# Altium PCB NB2DSK01.PcbDoc (part 16 of 17)
Units mil, origin at the board's own origin, x right, y up, seen from the top; angles counter-clockwise.
Board outline 11815 x 6500.03 mil, 8 copper layers (Top Layer, MidLayer1, MidLayer2, GND, PWR, MidLayer3, MidLayer4, Bottom Layer), stack 74.62 mil thick; 798 components, 1002 nets, 3927 pads, 3182 vias.
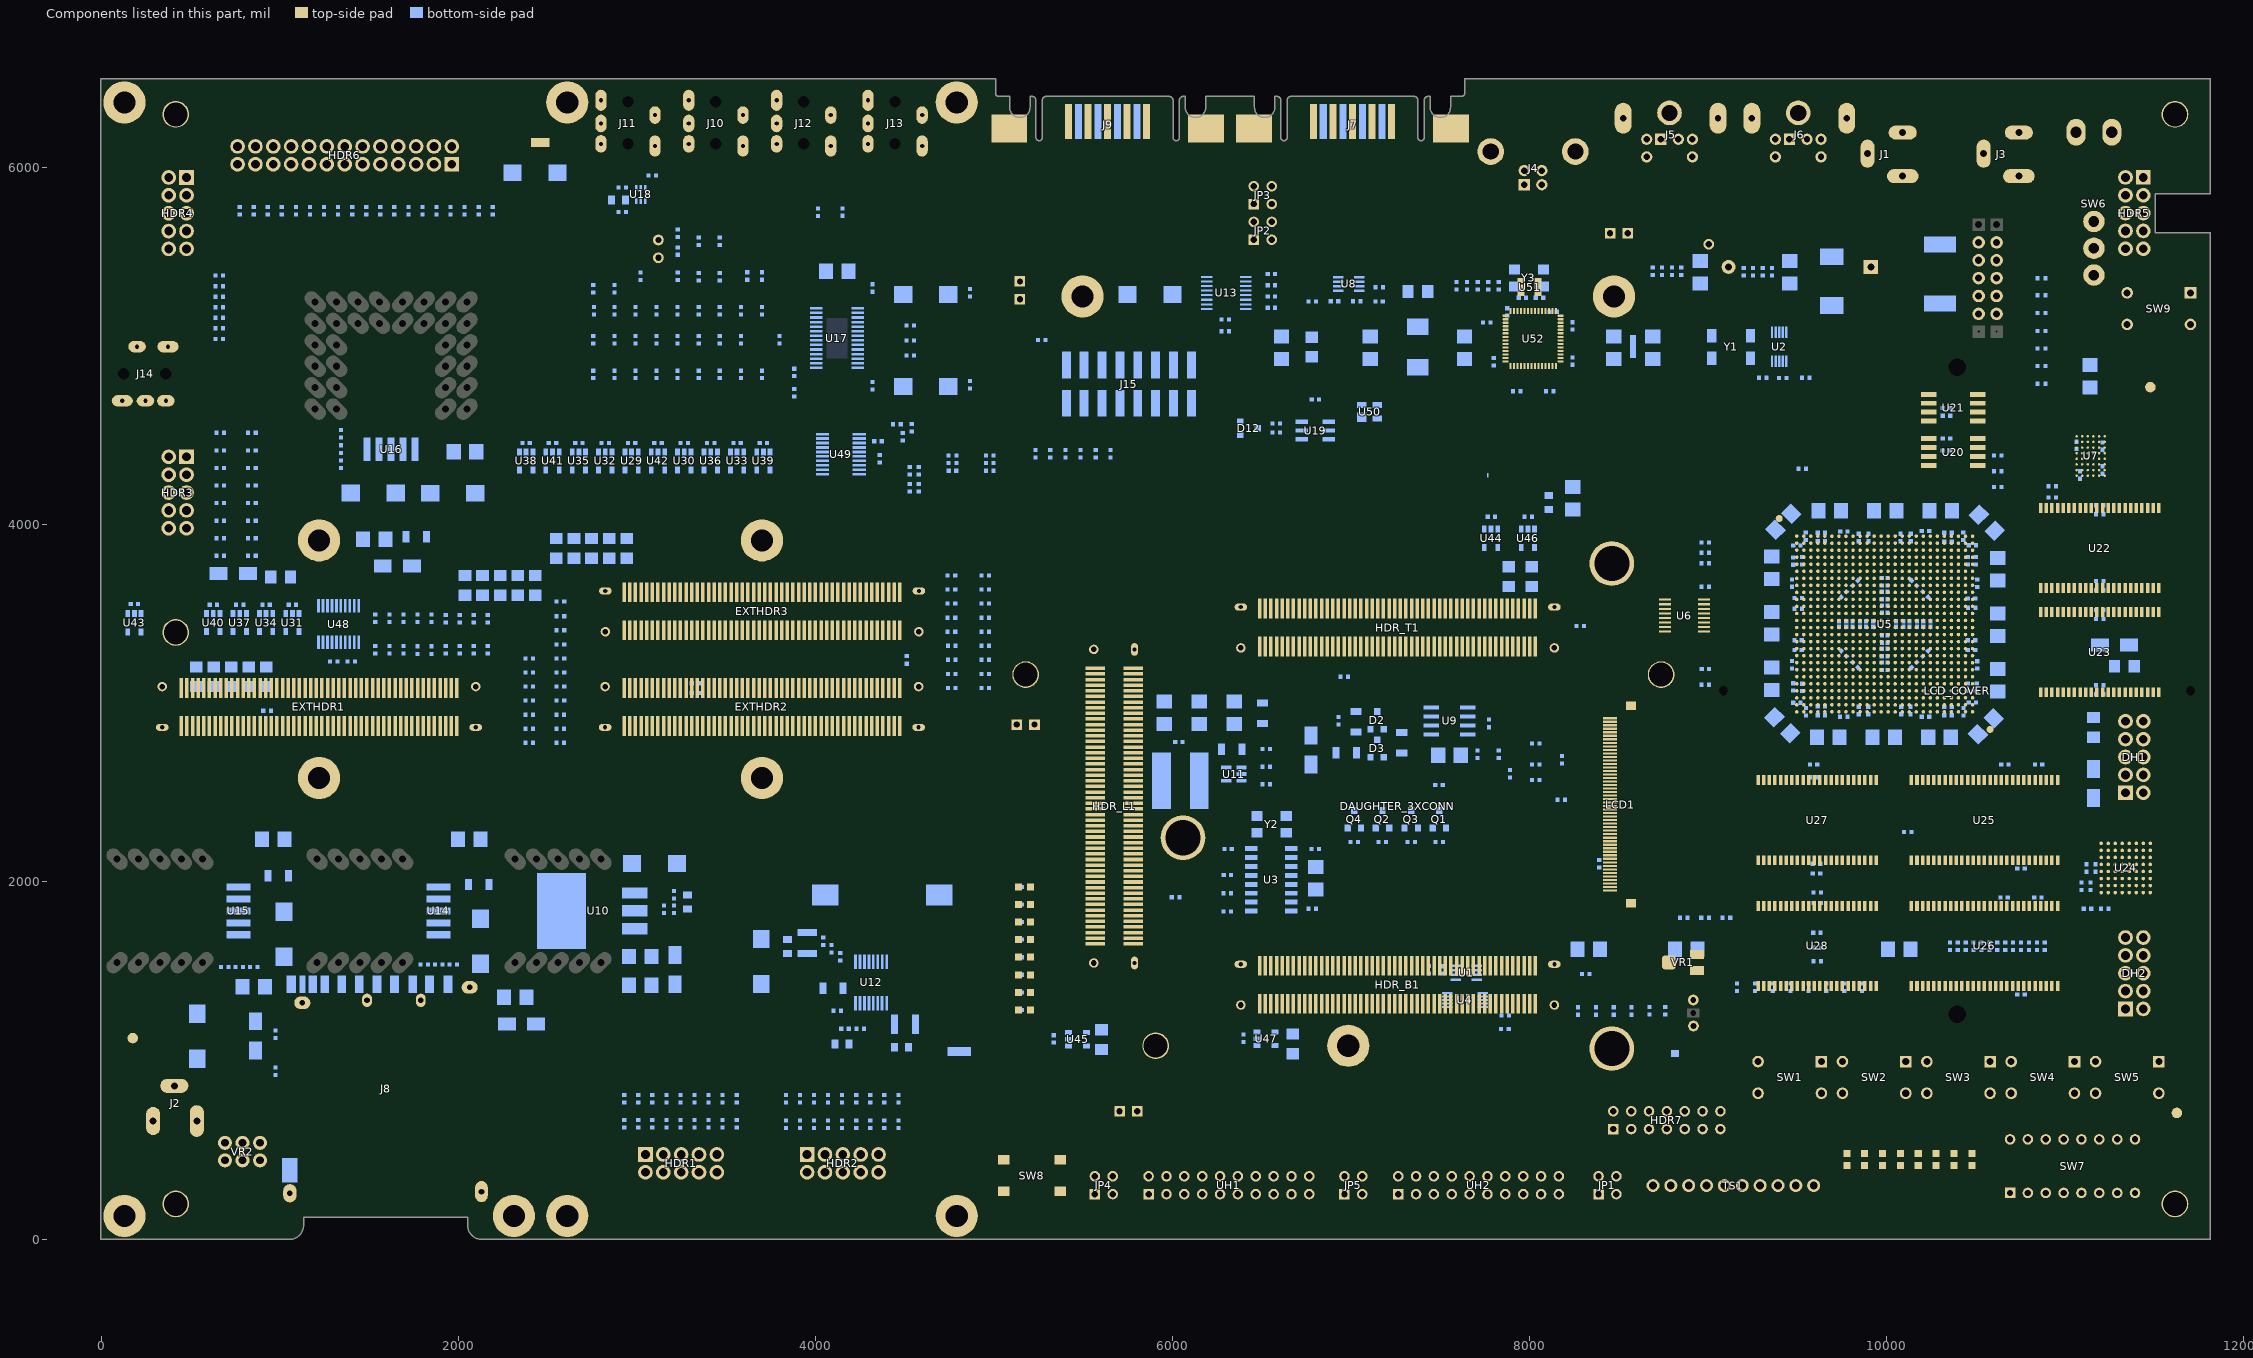
[diagram p22: the components of this part, seen from the top]

## Other copper (continued)
MidLayer3:
  region: 8912,4978.5 8912,4925.5 8926,4925.5 8926,4978.5
  rectangle net 1V2: 9204,3297 9401,3519
  rectangle net CSGND: 4303,4235 4344,4287.4
  rectangle net CSGND: 4284,4383 4346,4524
  rectangle net CSGND: 4344,4235 4519,4524
  rectangle net CSGND: 3997,4235 4303,4524
  rectangle net CSGND: 1196,3228 1468,3588
  rectangle net SHIELD: 10091,89 10495,228
  region net GND: 970.8,5426.84 970.8,4556 2281.17,4556 2281.17,5426.84
  rectangle net AUGND: 3966,4688.98 4276.87,4842.65
  rectangle net 1V2: 9295.68,3398.45 9533.68,3492.45
  rectangle net VCCX: 2228,1458 2873.68,2208
  rectangle net GND: 17,1458 643.68,2208
  rectangle net GND: 1118,1458 1763.68,2208
  text "L3" at 8850.5,4934.5 h35
Bottom Layer:
  rectangle net CAN_V+: 6801.84,6233 6886.4,6379
  rectangle: 6911.09,6233 6995.65,6379
  rectangle net CAN#.CAN_H: 7020.34,6233 7104.9,6379
  rectangle net GND: 7129.59,6233 7214.15,6379
  rectangle net RS232#.DCD: 5758.38,6233 5842.94,6379
  rectangle net RS232#.RTS: 5649.13,6233 5733.69,6379
  rectangle net RS232#.CTS: 5539.88,6233 5624.44,6379
  rectangle net RS232#.RI: 5430.63,6233 5515.18,6379
  region net SHIELD: 7647.54,6299.98 7470.54,6299.98 7470.54,6142.98 7647.54,6142.98
  rectangle net SHIELD: 6368.21,6142.98 6545.21,6299.98
  region net SHIELD: 6276.33,6299 6099.33,6299 6099.33,6142 6276.33,6142
  rectangle net SHIELD: 4997,6142 5174,6299
  region net GND: 9326,3967.41 9382.05,4023.46 9349.7,4055.81 9293.65,3999.76
  region net 2V5: 10510.79,4107 10566.84,4050.95 10599.19,4083.3 10543.14,4139.35
  region net GND: 10640.22,3957.08 10597.22,3914.08 10620.75,3890.55 10663.75,3933.55
  region net GND: 10536.02,2746.42 10592.07,2802.47 10561.27,2833.27 10505.22,2777.22
  region net GND: 9465.59,2782.79 9409.54,2838.84 9377.19,2806.49 9433.24,2750.44
  region net 2V5: 9459.76,2957.52 9406.26,3011.01 9353.26,2958.01 9406.75,2904.52
  region net 2V5: 10559.28,3010.75 10505.79,2957.26 10558.79,2904.26 10612.28,2957.75
  region net 2V5: 10523.66,4008.16 10470.16,4061.65 10417.16,4008.64 10470.65,3955.15
  region: 8912,4872.5 8912,4819.5 8926,4819.5 8926,4872.5
  region net 2V5: 9519.55,3937.65 9580.45,3998.55 9519.2,4059.8 9458.3,3998.9
  rectangle net 1V2: 3770,1696.4 3930,1990
  region net VCCX: 7955,2079 7955,2148 7895,2148 7895,2079
  region net VCCX: 7954,2009 7954,2038 7894,2038 7894,2009
  region net DBPOWER.3V3: 7981,1646 7925,1646 7925,1594 7981,1594
  region net VCCX: 7983,1260 7922,1260 7922,1203 7983,1203
  region net DBPOWER.5V0: 8086.8,1369 8048.19,1369 8048.19,1257 8086.8,1257
  rectangle net VCCX: 2248.68,1488.45 2867.85,2188.45
  rectangle net GND: 23.68,1477 642.85,2207.2
  rectangle net 3V3: 9965.68,3422.45 10010.68,3466.45
  rectangle net GND: 4593.68,1038.45 4673.68,1253.45
  rectangle net GND: 3668.68,1283.45 3768.68,1368.45
  rectangle net GND: 3838.68,1488.45 4008.68,1568.45
  rectangle net 5V0: 4303.68,1103.45 4393.68,1258.45
  region net GND: 10569.27,228 10538.64,228 10538.64,89 10569.27,89
  rectangle net GND: 10016.73,89 10047.67,228
  rectangle net SHIELD: 942.68,225 1001,648
  region net SHIELD: 986.68,185.45 986.68,233.45 818.68,233.45 818.68,185.45
  region net SHIELD: 640,648 588,648 588,225 640,225
  rectangle net SHIELD: 588,593 1001,648
  rectangle net SHIELD: 588,225 1001,391.73
  rectangle net SHIELD: 10091,89 10495,228
  rectangle net GND: 8047.06,1459.38 8085.67,1604.37
  region net 9V0: 7617,2952 7484,2952 7484,2849 7617,2849
  rectangle net AUGND: 4054.13,5203.74 4183.07,5231.3
  rectangle net AUGND: 3960.63,4759.84 4279.53,4862.21
  rectangle net AUGND: 4054.13,4861.22 4183.07,4888.78
  rectangle net AUGND: 4054.13,5178.15 4183.07,5205.71
  rectangle net AUGND: 4054.13,5152.56 4183.07,5180.12
  rectangle net AUGND: 4054.13,5126.97 4183.07,5154.53
  rectangle net AUGND: 3960.63,5230.32 4279.53,5330.71
  rectangle net AUGND: 4287.4,4964.57 4358.27,5015.75
  rectangle net AUGND: 3854.33,5000 3943.9,5066.93
  rectangle net GND: 1143.68,1481.88 1762.85,2204.6
  region net GND: 970.8,5428.45 970.8,4549 2236.22,4549 2236.22,5428.45
  rectangle net PBPOWER.1V2PBB: 3310,3149 3336,3186
  region net PBPOWER.1V8PBB: 3272.68,3197.46 3246.68,3197.46 3246.68,3160.46 3272.68,3160.46
  rectangle net PBPOWER.2V5PBB: 3184.02,3149 3210.02,3186
  region net PBPOWER.3V3PBB: 3146.69,3197.46 3120.69,3197.46 3120.69,3160.46 3146.69,3160.46
  rectangle net NetF1_1: 10220,5569.63 10378,5940
  region net 5VUSW: 10237.55,5509 10237.55,5238.92 10360.55,5238.92 10360.55,5509
  region net 5VUSW: 9643,5514.68 9643,5303 9744,5303 9744,5514.68
  region net GND: 9643,5241.06 9643,5099 9744,5099 9744,5241.06
  rectangle net 2V5: 895,1542 1047,1634
  rectangle net NetL2_1: 4318,1376 4599,1502
  rectangle net 1V2: 3770,1866 4132,1990
  region net SHIELD: 10494.85,205.58 10513.68,201.45 10494.85,197.58 10494.85,205.58
  region net 3V3: 10413.39,3334.65 10437.01,3350.39 10448.82,3350.39 10448.82,3303.15 10437.01,3303.15 10413.39,3318.9
  region net 3V3: 10413.39,3570.87 10437.01,3586.62 10448.82,3586.62 10448.82,3539.37 10437.01,3539.37 10413.39,3555.12
  region net 3V3: 10098.43,3870.08 10082.68,3893.7 10082.68,3905.51 10129.92,3905.51 10129.92,3893.7 10114.17,3870.08
  region net 3V3: 9862.2,3870.08 9846.46,3893.7 9846.46,3905.51 9893.7,3905.51 9893.7,3893.7 9877.95,3870.08
  region net 3V3: 9562.99,3555.12 9539.37,3539.37 9527.56,3539.37 9527.56,3586.61 9539.37,3586.61 9562.99,3570.87
  region net 3V3: 9562.99,3318.9 9539.37,3303.15 9527.56,3303.15 9527.56,3350.39 9539.37,3350.39 9562.99,3334.64
  region net 3V3: 9877.95,3019.69 9893.7,2996.06 9893.7,2984.25 9846.46,2984.25 9846.46,2996.06 9862.2,3019.69
  region net 3V3: 10114.18,3019.69 10129.92,2996.06 10129.92,2984.25 10082.68,2984.25 10082.68,2996.06 10098.43,3019.69
  region net GND: 10538.85,205.58 10519.32,201.58 10538.85,197.58 10538.85,205.58
  region net GND: 10538.8,195.58 10519.26,191.58 10538.8,187.58 10538.8,195.58
  region net SHIELD: 10494.8,195.58 10513.68,191.45 10494.8,187.58 10494.8,195.58
  region net GND: 10538.8,185.58 10519.26,181.58 10538.8,177.58 10538.8,185.58
  region net SHIELD: 10494.8,185.58 10513.68,181.45 10494.8,177.58 10494.8,185.58
  region net GND: 10538.8,175.58 10519.68,171.45 10538.8,167.58 10538.8,175.58
  region net SHIELD: 10494.8,175.58 10514.33,171.58 10494.8,167.58 10494.8,175.58
  region net GND: 10538.8,165.58 10519.26,161.58 10538.8,157.58 10538.8,165.58
  region net SHIELD: 10494.8,165.58 10513.68,161.45 10494.8,157.58 10494.8,165.58
  region net GND: 10538.8,155.58 10519.26,151.58 10538.8,147.58 10538.8,155.58
  region net SHIELD: 10494.8,155.58 10513.68,151.45 10494.8,147.58 10494.8,155.58
  region net GND: 10538.8,145.58 10519.68,141.45 10538.8,137.58 10538.8,145.58
  region net SHIELD: 10494.8,145.58 10514.33,141.58 10494.8,137.58 10494.8,145.58
  region net GND: 10538.8,135.58 10519.68,131.45 10538.8,127.58 10538.8,135.58
  region net SHIELD: 10494.8,135.58 10514.33,131.58 10494.8,127.58 10494.8,135.58
  region net GND: 10538.8,125.58 10519.68,121.45 10538.8,117.58 10538.8,125.58
  region net SHIELD: 10494.8,125.58 10514.33,121.58 10494.8,117.58 10494.8,125.58
  region net GND: 10538.8,115.58 10519.68,111.45 10538.8,107.58 10538.8,115.58
  region net SHIELD: 10494.8,115.58 10514.33,111.58 10494.8,107.58 10494.8,115.58
  region net GND: 10047.28,115.58 10066.81,111.58 10047.28,107.58 10047.28,115.58
  region net SHIELD: 10091.28,115.58 10072.68,111.45 10091.28,107.58 10091.28,115.58
  region net GND: 10047.28,125.58 10066.81,121.58 10047.28,117.58 10047.28,125.58
  region net SHIELD: 10091.28,125.58 10072.68,121.45 10091.28,117.58 10091.28,125.58
  region net GND: 10047.28,135.58 10066.81,131.58 10047.28,127.58 10047.28,135.58
  region net SHIELD: 10091.28,135.58 10072.68,131.45 10091.28,127.58 10091.28,135.58
  region net GND: 10047.28,145.58 10066.81,141.58 10047.28,137.58 10047.28,145.58
  region net SHIELD: 10091.28,145.58 10072.68,141.45 10091.28,137.58 10091.28,145.58
  region net GND: 10047.28,155.58 10066.81,151.58 10047.28,147.58 10047.28,155.58
  region net SHIELD: 10091.28,155.58 10072.68,151.45 10091.28,147.58 10091.28,155.58
  region net GND: 10047.15,165.45 10066.68,161.45 10047.15,157.45 10047.15,165.45
  region net SHIELD: 10091.28,165.58 10071.74,161.58 10091.28,157.58 10091.28,165.58
  region net GND: 10047.28,175.58 10066.81,171.58 10047.28,167.58 10047.28,175.58
  region net SHIELD: 10091.28,175.58 10072.68,171.45 10091.28,167.58 10091.28,175.58
  region net GND: 10047.28,185.58 10066.81,181.58 10047.28,177.58 10047.28,185.58
  region net SHIELD: 10091.28,185.58 10072.68,181.45 10091.28,177.58 10091.28,185.58
  region net GND: 10047.28,195.58 10066.81,191.58 10047.28,187.58 10047.28,195.58
  region net SHIELD: 10091.28,195.58 10072.68,191.45 10091.28,187.58 10091.28,195.58
  region net SHIELD: 10091.33,205.58 10072.68,201.45 10091.33,197.58 10091.33,205.58
  region net GND: 10047.33,205.58 10066.87,201.58 10047.33,197.58 10047.33,205.58
  text "BL" at 8850.5,4828.5 h35
GND (plane layer: these items are gaps in the copper):
  circle w60: c5096.6,798.52 r38.29
  region: 8928.5,4817 8928.5,5031.5 8796.5,5031.5 8796.5,4817
  region: 8796.5,5246 8796.5,5084.5 8928.5,5084.5 8928.5,5246
  lines w5: 8811,5057.37 8839.91,5057.37 ; 8811,5057.37 8810.92,5046.77 8839.91,5057.37 ; 8811,5057.37 8810.92,5067.98 8839.91,5057.37
  lines w7: 8814.45,5053.13 8824.35,5053.13 ; 8814.45,5061.62 8824.35,5061.62
  text "P1" at 8850.5,5040.5 h35
  text "GND" at 358.27,425.2 h34
PWR (plane layer: these items are gaps in the copper):
  circle w60: c5096.6,798.52 r38.29
  region: 8796.5,5246 8796.5,5031.5 8928.5,5031.5 8928.5,5246
  region: 8928.5,4817 8928.5,4978.5 8796.5,4978.5 8796.5,4817
  lines w5: 8811,5004.37 8810.92,5014.98 8839.91,5004.37 ; 8811,5004.37 8810.92,4993.77 8839.91,5004.37 ; 8811,5004.37 8839.91,5004.37
  lines w7: 8814.45,5000.13 8824.35,5000.13 ; 8814.45,5008.62 8824.35,5008.62
  lines w38: 10984.46,5474 11280.74,5474
  lines w40: 788,582 925.2,582 4720,582 5047,255 5121,181 9968,181 10042,255 10148,361 10401,361 11040,361 11415,736 11415,1099 11527,1211 11527,4506 11380.53,4652.47 11380.53,5077.94 11280.74,5177.72 11280.74,5331.26 11280.74,5778.26 ; 789,0 789,937.33 789,1143.33 ; 1299.84,3833.31 1394.99,3928.45 1673.68,3928.45 1723.68,3978.45 1723.68,4138.45 1758.68,4173.45 1888.68,4173.45 2510.85,4173.45 2615.9,4068.4 2615.9,3766.4 2528.7,3679.2 2134.9,3679.2 2087.6,3726.5 2087.6,3851.4 2061.6,3877.4 2014.5,3877.4 1983.8,3846.7 1983.8,3685.1 1969.15,3670.45 1815.68,3670.45 1503.68,3670.45 1187.45,3354.23 610.13,3354.23 586.61,3330.71 586.61,1833.45 2505.74,1833.45 3681.34,1833.45 4603.68,1833.45 ; 1303.15,3836.61 1230.32,3763.78 701.71,3763.78 653.54,3811.95 653.54,3876.17 653.54,5673.23 763.78,5783.47 2456.69,5783.47 2503.94,5736.22 2503.94,4685.04 2637.8,4551.18 4663.86,4551.18 5216.6,5103.92 5560.61,5103.92 6000.92,5103.92 6112,5215 6112,5343 6298,5529 8696.54,5529 10929.46,5529 10973.46,5485 10984.46,5474 ; 4605.32,1835.09 4603.68,1833.45 ; 4755.91,3.94 4759.84,0 ; 4912,6496.06 4912,6043 4964,5991 8398,5991 8423.45,6016.45 8622,6215 8961,6215 9015,6161 9286,6161 9338,6213 9680,6213 9720,6173 9737,6156 9822,6156 9881,6215 10844,6215 11280.74,5778.26 ; 9587,5528 9587,5292 11280.74,5292 ; 11280.74,5606 11280.74,5778.26 ; 789,1143.33 925.2,1279.53 ; 789,1143.33 925.2,1279.53 ; 925.2,1279.53 2947.61,1279.53 3134.97,1092.17 4099.18,1092.17 4235.64,955.71 4528.54,955.71 4893.51,955.71 5934.3,1996.5 6165.4,1996.5 6283.3,2114.4 6306.9,2138 6306.9,2714.6 6306.9,2763 6268,2801.9 6219.6,2801.9 5948.4,2801.9 5884.7,2738.2 4979.95,1833.45 4603.68,1833.45
  text "P2" at 8850.5,4987.5 h35
  text "3V3" at 853.68,648.45 h78.74
  text "5V0" at 318.25,475.42 h78.74
  text "SHIELD" at 1018.68,433.45 h78.74
Multi-Layer:
  text "1" at 19394.94,-5240.28 h120
  text "OF" at 19590.02,-5239.73 h80
  text "1" at 19829.94,-5240.28 h120

## Silkscreen, mask and mechanical layers (free items; w line width, h text height)
Top Overlay:
  drawing of 8418 lines, arcs and shapes, not listed
  text "KMDGX-6S-BS2715C" at 8539,6412 h34
  text "KMDGX-6S-BS3395C" at 9259.47,6412 h34
  text "5VDC" at 10324.54,6411.05 h80
  text "POWER" at 10285.17,6337.59 h80
  text "PC PARALLEL PORT" at 911,6272 h102.36
  text "IN" at 10387.53,6264.31 h80
  text "DC" at 10285,6113 h70
  text "L" at 2862,6073 h34
  text "R" at 3020,6073 h34
  text "L" at 3354.13,6073 h34
  text "R" at 3512.13,6073 h34
  text "L" at 3846.25,6073 h34
  text "R" at 4004.25,6073 h34
  text "L" at 4358.06,6073 h34
  text "R" at 4516.06,6073 h34
  text "NANOTALK" at 57,6030 h90
  text "NANOTALK" at 11332.23,6030.39 h90
  text "MICROPHONE" at 2773.76,5994.71 h60
  text "LINE OUT" at 3809.19,5995.5 h60
  text "LINE IN" at 3347.03,5993.92 h60
  text "HEADPHONES" at 4261.5,5992.35 h60
  text "MOUSE" at 9389,5907 h80
  text "KEYBOARD" at 8568,5903 h80
  text "1+2  CiA DS102" at 6678,5869.37 h60
  text "PIN 2 - RXD" at 5179.8,5861.6 h60
  text "TOP SIDE" at 1238.22,5842.53 h100
  text "PIN 3 - TXD" at 5179.8,5803.36 h60
  text "2+4 and 1+3  NB1" at 6677.94,5796.32 h60
  text "INSERT" at 76.24,5785.88 h40
  text "RS232" at 5626.7,5776 h120
  text "CAN" at 7291.58,5775.5 h120
  text "PIN 7 - RTS" at 5179.8,5744.56 h60
  text "KEY" at 115.18,5722.49 h40
  text "PIN 8 - CTS" at 5179.8,5685.68 h60
  text "2" at 6348.68,5678.45 h39.37
  text "4" at 6618.68,5678.45 h39.37
  text "1+2 CAN 1Mbps Mode" at 6678,5672.54 h55
  text "0V" at 10388,5670 h45
  text "0V" at 10694,5668 h45
  text "GND" at 10791,5660 h70.87
  text "DOWN" at 89.85,5659.1 h40
  text "GND" at 10205,5659 h70.87
  text "USB 2.0" at 7854.33,5649.61 h102.36
  text "DS102" at 7256.7,5646 h110
  text "EIA-574" at 5611.7,5645.4 h110
  text "PINS 1+4+6" at 5179.8,5626.8 h60
  text "3+4 CAN 120R  TERM" at 6678,5593.55 h55
  text "-7V5" at 10210,5559 h70.87
  text "FROM" at 32,5553 h70
  text "TO" at 11529.26,5553.39 h70
  text "GND" at 8425.68,5516.45 h78.74
  text "MASTER" at 30,5489 h70
  text "SLAVE" at 11527.26,5489.39 h70
  text "16V5" at 10198,5459 h70.87
  text "+" at 9001.81,5444.99 h40
  text "LM4849MH" at 3957.34,5381.65 h70
  text "9V0" at 10230,5359 h70.87
  text "CR2032" at 8775.5,5329.64 h80
  text "GND" at 4900,5270 h78.74
  text "3V0" at 9083.8,5234.8 h60
  text "DAUGHTER BOARD" at 6443,5199 h102.36
  text "VBAT" at 10791,5159 h70.87
  text "AUDIO TEST" at 37.82,5079.05 h86.61
  text "POWER SUPPLY TEST POINTS" at 10314,5045 h50
  text "TP0" at 10152,5038 h80
  text "R" at 423.06,4916.3 h34 r90
  text "GROUND" at 1442.68,4888.45 h94.49
  text "L" at 423.06,4758.3 h34 r90
  text "25P80" at 10358,4735 h36 r270
  text "AUDIO AMPLIFIER" at 3922.66,4672.45 h50
  text "XCF08PFS48C" at 10989,4615 h35
  text "SYSTEM 3V3 SUPPLY" at 1384,4518 h52
  text "25P80" at 10358,4486.97 h36 r270
  text "SYSTEM JTAG" at 15.76,4451.81 h80
  text "NB2DSK01.08" at 5883.26,4442.23 h98.43
  text "Desktop" at 5883.26,4384.24 h60
  text "NanoBoard" at 5883.27,4308.27 h60
  text "NB2DSK01.08" at 6536.61,4272.23 h60
  text "FLASH" at 11061.02,4149.33 h34
  text "PERIPHERAL BOARD C" at 3185,4106 h102.36
  text "XC3S1500-4FG676C" at 9512.3,4019.48 h50
  text "SRAM-256Kx16" at 10932.32,3907.25 h50
  text "AD7843" at 8863,3561 h30 r270
  text "SRAM-256Kx16" at 10932.32,3324.57 h50
  text "SRAM" at 11085.19,2950.27 h60
  text "USER POWER CONFIG" at 7117.98,2823 h34
  text "JP4/JP5" at 6880.65,2819 h60
  text "GND" at 5096,2760 h78.74
  text "SDRAM" at 10413.03,2680.78 h60
  text "SRAM" at 9501.7,2679.2 h60
  text "5V0" at 7086.18,2651.75 h75
  text "3V3" at 7460.63,2651.69 h75
  text "- POWER CONFIG USER I/O PORT A" at 6905.44,2490.39 h32
  text "DEBUG PORT A" at 11561,2489 h40 r90
  text "JP4" at 6782.44,2486.69 h60
  text "- POWER CONFIG USER I/O PORT B" at 6905.44,2427.39 h32
  text "JP5" at 6782.44,2423.69 h60
  text "PERIPHERAL BOARD A" at 708,2325 h102.36
  text "PERIPHERAL BOARD B" at 3188.32,2324 h102.36
  text "SRAM-256Kx16" at 9333.07,2251.71 h50
  text "DRAM-16Mx16" at 10299.55,2250.13 h50
  text "DAC REFERENCE CONFIG" at 7015.3,2168.15 h34
  text "JP1" at 6880.33,2164.15 h60
  text "HOST STATUS" at 4912,2053 h60
  text "2.048" at 7085.92,1996.84 h75
  text "3.30" at 7460.31,1996.9 h75
  text "SL1" at 4969.82,1949.12 h70.87
  text "SL2" at 4969.82,1851.45 h70.87
  text "GROUND" at 1293.68,1828.45 h94.49
  text "GROUND" at 148.68,1818.45 h94.49
  text "VCCX" at 2443.68,1818.45 h94.49
  text "S29GL256N11FFIV" at 11128.8,1763 h35
  text "SL3" at 4969.82,1753.45 h70.87
  text "FLASH" at 11131.2,1705.2 h34
  text "CONTRAST" at 8739,1700 h34
  text "SL4" at 4969.82,1654.45 h70.87
  text "SL5" at 4969.82,1555.45 h70.87
  text "SRAM-256Kx16" at 9333.07,1546.99 h50
  text "DRAM-16Mx16" at 10299.55,1545.41 h50
  text "SL6" at 4969.82,1457.45 h70.87
  text "DAUGHTER BD ADJ SUPPLY" at 2246,1424 h52
  text "SYSTEM 2V5 SUPPLY" at 73,1422 h52
  text "SYSTEM 1V8 SUPPLY" at 1218,1422 h52
  text "SL7" at 4969.82,1358.45 h70.87
  text "DEBUG PORT B" at 11561,1277.98 h40 r90
  text "SL8" at 4969.82,1260.45 h70.87
  text "K" at 5226.74,1093.3 h30
  text "TOUCH" at 8684.02,972.01 h100
  text "5VDC OUT" at 165.35,964.57 h80
  text "SCREEN" at 8685.98,890 h100
  text "V8" at 8050,674 h140
  text "DC" at 726.89,656.96 h80
  text "GND" at 5675,596 h78.74
  text "USER LEDS" at 9988,569 h55
  text "K" at 10549,556 h30
  text "USER BOARD POWER" at 110.24,460.63 h50
  text "I2C - DAC - ADC" at 8704.73,448.82 h102.36
  text "CONFIG SWITCH 7" at 10734.16,384.61 h50
  text "2" at 5473.68,333.45 h39.37
  text "4" at 5728.68,333.45 h39.37
  text "2" at 6873.68,333.45 h39.37
  text "4" at 7128.68,333.45 h39.37
  text "2" at 8293.68,333.45 h39.37
  text "4" at 8548.68,333.45 h39.37
  text "7" at 9757.78,284.37 h94.49
  text "6" at 9857.78,284.37 h94.49
  text "5" at 9957.78,284.37 h94.49
  text "4" at 10057.78,284.37 h94.49
  text "3" at 10156.2,284.37 h94.49
  text "2" at 10254.63,284.37 h94.49
  text "1" at 10357.78,284.37 h94.49
  text "0" at 10457.78,284.37 h94.49
  text "3" at 7128.68,233.45 h39.37
  text "1" at 8303.68,233.45 h39.37
  text "3" at 8548.68,233.45 h39.37
  text "1" at 5483.68,228.45 h39.37
  text "3" at 5728.68,228.45 h39.37
  text "1" at 6883.68,228.45 h39.37
  text "ESD" at 9952,186 h60
  text "SD/Multimedia Card" at 1191.68,166.45 h94.49
  text "User Board A" at 2982.68,164.45 h94.49
  text "User Board B" at 3882.68,164.45 h94.49
  text "DAUGHTER BD" at 4998.28,129.63 h65
  text "+" at 8673.11,118.59 h40
  text "-" at 9573.11,118.59 h40
  text "1" at 9280,117 h66.93
  text "0" at 9177,116 h66.93
  text "2" at 9376,116 h66.93
  text "0" at 8776,115 h66.93
  text "1" at 8882,115 h66.93
  text "2" at 8977,115 h66.93
  text "3" at 9080,115 h66.93
  text "3R" at 9462,115 h66.93
  text "5V" at 5588.68,63.45 h70.87 r90
  text "5V" at 6988.68,63.45 h70.87 r90
  text "3V3" at 7088.68,48.45 h70.87 r90
  text "3V3" at 8508.68,48.45 h70.87 r90
  text "REF" at 8408.68,43.45 h70.87 r90
  text "3V3" at 5688.68,38.45 h70.87 r90
  text "Analogue In" at 9306,36 h65
  text "Analogue Out" at 8741,35 h65
  text "TEST/RESET" at 4993.16,32.7 h80
  text "Volume" at 743.68,28.45 h94.49
  text "User Header A" at 6225,24 h94.49
  text "User Header B" at 7626,24 h94.49
  text "TOUCH HERE FIRST" at 9751,20 h34
Bottom Overlay:
  drawing of 3399 lines, arcs and shapes, not listed
  text "1" at 2862.06,6417.43 h35
  text "PURPLE" at 8963.68,6398.45 h100
  text "GREEN" at 9663.68,6398.45 h100
  text "ON/OFF" at 11323.68,6398.45 h100
  text "DC OUT" at 10258.68,6393.45 h100
  text "DC IN" at 10848.68,6393.45 h100
  text "1" at 3354.18,6358.73 h35
  text "1" at 3846.31,6358.73 h35
  text "1" at 4358.12,6358.73 h35
  text "10" at 3056.33,6279.5 h35
  text "10" at 3548.46,6279.5 h35
  text "10" at 4040.59,6279.5 h35
  text "10" at 4552.4,6279.5 h35
  text "11" at 2884.08,6222.85 h35
  text "11" at 3376.2,6222.85 h35
  text "11" at 3868.33,6222.85 h35
  text "11" at 4380.14,6222.85 h35
  text "2" at 8909.88,6203.09 h40
  text "2" at 9630.35,6203.09 h40
  text "2" at 9960.44,6180.1 h40
  text "2" at 10610.84,6180.1 h40
  text "9" at 6791.26,6162.63 h34
  text "6" at 7236.36,6160.71 h34
  text "USB PORT" at 8130,6151.04 h35
  text "4" at 9016.28,6142.7 h40
  text "4" at 9736.75,6142.7 h40
  text "3" at 8571.8,6140.98 h40
  text "3" at 9292.28,6140.98 h40
  text "+" at 6826.31,6125.76 h40 r270
  text "3" at 2873.21,6115.15 h35
  text "3" at 3365.33,6115.15 h35
  text "3" at 3857.46,6115.15 h35
  text "3" at 4369.27,6115.15 h35
  text "2" at 3050.46,6109.29 h35
  text "2" at 3542.59,6109.29 h35
  text "2" at 4034.72,6109.29 h35
  text "2" at 4546.53,6109.29 h35
  text "4" at 7981.56,6061.99 h40
  text "3" at 8079.55,6061.99 h40
  text "3" at 9999.73,6061.99 h40
  text "3" at 10650.13,6061.99 h40
  text "6" at 9016.28,6044.27 h40
  text "6" at 9736.75,6044.27 h40
  text "5" at 8571.8,6042.56 h40
  text "5" at 9292.28,6042.56 h40
  text "RS232 SERIAL PORT" at 5863.3,6016.6 h35
  text "CAN PORT" at 7130.2,6015.9 h35
  text "+" at 10207.73,5970 h40 r180
  text "+" at 10858.12,5970 h40 r180
  text "PINK" at 2893,5940 h60
  text "BLACK" at 3447,5940 h60
  text "GREEN" at 3940,5940 h60
  text "BLUE" at 4404.4,5940.31 h60
  text "PS2 KEYBOARD INTERFACE" at 9100,5940.47 h35
  text "NANOTALK" at 11222,5938 h35
  text "1" at 9960.45,5936.01 h40
  text "1" at 10610.84,5936.01 h40
  text "PS2 MOUSE INTERFACE" at 9785,5935.47 h35
  text "OUT" at 11223,5883 h35
  text "MIC IN" at 3221,5878 h35
  text "LINE IN" at 3625,5878 h35
  text "LINE OUT" at 4119,5878 h35
  text "HEADPHONES" at 4605,5878 h35
  text "BOTTOM SIDE" at 1600,5843 h100
  text "9812" at 3059,5840 h24
  text "1" at 7977.76,5789.04 h40
  text "2" at 8086.75,5789.04 h40
  text "1" at 11276.84,5682.38 h40
  text "+" at 9098.91,5579.96 h40 r270
  text "24MHz" at 8067,5482 h34
  text "3051" at 6993.01,5383.72 h23 r90
  text "3" at 11288.58,5382.38 h40
  text "SYSTEM 3V3 SUPPLY" at 1873,5354 h52.01
  text "3232" at 6310.89,5345.6 h34 r90
  text "FUSE" at 10276,5331 h80 r270
  text "NANOTALK IN" at 525,5279 h35
  text "32K768Hz" at 9240.3,5127.3 h34
  text "AUDIO TEST IN" at 437,5070 h35
  text "3V3" at 5418.57,5009.51 h60
  text "1W" at 5517,5009.19 h60
  text "CS2" at 5644.17,5009.28 h60
  text "CK2" at 5769.85,5009.41 h60
  text "L+" at 5850.33,5009.41 h60
  text "5V" at 5947.7,5009.58 h60
  text "R-" at 6027.37,5009.26 h60
  text "AGND" at 6209,5009.24 h60
  text "1391" at 9447.6,4976.11 h34
  text "2" at 388.69,4919.56 h35
  text "10" at 223.76,4916.63 h35
  text "BLACK" at 696.85,4755.91 h60
  text "1" at 128.09,4743.48 h35
  text "11" at 268.96,4742.3 h35
  text "3" at 374.02,4741.72 h35
  text "DS2406" at 6799.39,4599.65 h28 r90
  text "L-" at 5824.66,4533.69 h60
  text "CK1" at 5418.76,4533.52 h60
  text "DI1" at 5517,4533.46 h60
  text "CS1" at 5635.3,4533.56 h60
  text "DI2" at 5739.78,4533.46 h60
  text "GND" at 5963.66,4533.52 h60
  text "R+" at 6054.66,4533.54 h60
  text "VOL" at 6183.66,4533.52 h60
  text "TO NB2DSK-SPK01" at 6264.1,4382.09 h35
  text "4372" at 2433.42,4345.45 h32
  text "4372" at 2581.06,4345.45 h32
  text "4372" at 2728.69,4345.45 h32
  text "4372" at 2876.33,4345.45 h32
  text "4372" at 3023.97,4345.45 h32
  text "4372" at 3171.61,4345.45 h32
  text "4372" at 3319.24,4345.45 h32
  text "4372" at 3466.88,4345.45 h32
  text "4372" at 3614.52,4345.45 h32
  text "4372" at 3762.16,4345.45 h32
  text "MAX1229" at 4135,4301 h34 r270
  text ".Application_BuildNumber" at 6530.13,4050 h95
  text "BUILD No:" at 6907.79,4050 h50
  text "SVN 6145" at 6530.13,3941.67 h95
  text "REVISION No:" at 7017.76,3941.67 h50
  text "4372" at 7836.96,3912.38 h32
  text "4372" at 8043.65,3912.38 h32
  text "+5V" at 386,3846 h50 r270
  text "MACHINE ID:" at 6988.96,3833.33 h50
  text "GND" at 460,3830 h50 r270
  text ".ComputerName" at 6530.13,3829.39 h95
  text "PCB MANUFACTURER:" at 7324.13,3725 h50
  text "HOST PROGRAMMING" at 557.6,3700.5 h35
  text "PORT" at 557.6,3645.6 h35
  text "4372" at 681.45,3439.94 h32
  text "4372" at 829.09,3439.94 h32
  text "4372" at 976.72,3439.94 h32
  text "4372" at 1124.36,3439.94 h32
  text "4372" at 239.5,3438.9 h32
  text "MAX1229" at 1438,3422 h34
  text "NB2DSK01" at 4077.14,3325.35 h150
  text "GND" at 11355,3053 h50 r90
  text "+5V" at 11429,3037 h50 r90
  text "LM317" at 7526,2825 h34 r270
  text "COMPLIANCE:" at 5169.08,2700.05 h45
  text "CLASS 2" at 4419.08,2610.05 h40
  text "IPC-A-600H" at 5079.08,2610.05 h40
  text "CLASS 2" at 4419.08,2530.05 h40
  text "TYPE 3" at 4669.08,2530.05 h40
  text "IPC-6012D" at 5079.08,2530.05 h40
  text "MANUFACTURE" at 3261.27,2468.01 h40
  text "20MHz" at 6625,2426 h34
  text "DATE" at 3262.37,2401.21 h40
  text "SYSTEM 1.2V SUPPLY" at 4807.09,2283.47 h52.01
  text "DEBUG HEADER A" at 11781,2244 h35
  text "SYSTEM 2V5 SUPPLY" at 541.9,2223.8 h52.01
  text "VCCX SUPPLY" at 2599.3,2223.8 h52.01
  text "SYSTEM 1V8 SUPPLY" at 1648.1,2222.6 h52.01
  text "DESIGNED IN SYDNEY" at 9141,2209 h40
  text "AUSTRALIA" at 9035.43,2120 h50
  text "INDUCTOR" at 4509.28,2010.8 h40
  text "ICS307-02" at 6531,1880 h34 r270
  text "GND" at 11350,1842 h50 r90
  text "+5V" at 11425,1827 h50 r90
  text "2R2/2.2uH" at 4500.28,1817.8 h35
  text "9A 6.8mR" at 4494.28,1757.8 h35
  text "1037" at 7630.02,1456.19 h22 r270
  text "1831" at 4361,1426 h40
  text "5841" at 7633.05,1293.82 h32 r270
  text "4372" at 6537,1176 h32 r90
  text "4372" at 5481.41,1172.98 h32 r90
  text "DEBUG HEADER B" at 11781,1040 h35
  text "5V OUT" at 290,880 h80
  text "SD CARD" at 2382.4,863.2 h35
  text "SD CARD" at 1849.15,810.11 h120
  text "+" at 608.25,808.64 h40 r90
  text "3" at 425,745 h40
  text "VOLUME" at 877.77,694.41 h34
  text "2" at 396,644 h40
  text "1" at 454,643 h40
  text "HIROSE" at 1766.48,629.01 h70
  text "HRS6090003-5" at 1927.89,514.84 h60
  text "USER BD JTAG A" at 2835,500 h35
  text "USER BD JTAG B" at 4949,498 h35
  text "ADC/DAC INPUT/OUTPUT" at 9001,483.9 h28
  text "A" at 5681,169 h50
  text "B" at 7077,169 h50
  text "SPARK GAP" at 10419.49,141.87 h50
  text "USER DIP SWITCH" at 11247.7,121.3 h35
  text "3/5V" at 5656.36,119.7 h25
  text "3/5V" at 7054,119.7 h25
  text "REF" at 8464.32,119.73 h25
  text "ADC/DAC INPUT/OUTPUT" at 9429.6,116.4 h35
  text "USER HEADER B" at 7915.5,115.2 h35
  text "USER HEADER A" at 6513.8,112.7 h35
Top Solder:
  rectangle: 11360.79,104.81 11419.45,179.44
  rectangle: 11260.79,104.81 11319.45,179.44
  rectangle: 11160.79,104.81 11219.45,179.44
  rectangle: 11060.79,104.81 11119.45,179.44
  rectangle: 10960.79,104.81 11019.45,179.44
  rectangle: 10860.79,104.81 10919.45,179.44
  rectangle: 10760.79,104.81 10819.45,179.44
  rectangle: 10660.79,104.81 10719.45,179.44
  region: 7673.78,6388 7569.78,6388 7569.78,6140 7673.78,6140
  rectangle: 6342.21,6140 6446.21,6388
  region: 6302.57,6388 6198.57,6388 6198.57,6140 6302.57,6140
  rectangle: 4971,6140 5075,6388
  rectangle: 8795.4,4815.6 8930,5246.3
  region: 1138.68,5308.45 1138.68,4588.45 2108.68,4588.45 2108.68,5308.45
  rectangle: 10091,89 10495,228
  rectangle: 1143.68,1488.45 1763.68,2188.45
  rectangle: 23.68,1488.45 643.68,2188.45
  rectangle: 2248.68,1488.45 2868.68,2188.45
  rectangle: 3952,4756 4287,5339
  rectangle: 4971.24,6106.8 5246.98,6145.1
  rectangle: 5383.8,6245.3 5452.76,6373.1
  rectangle: 5493.05,6245.3 5562.01,6373.1
  rectangle: 5602.3,6245.3 5671.26,6373.1
  rectangle: 5711.56,6245.3 5780.51,6373.1
  rectangle: 5820.81,6245.3 5889.76,6373.1
  rectangle: 6755.01,6245.3 6823.97,6373.1
  rectangle: 6864.27,6245.3 6933.22,6373.1
  rectangle: 6973.52,6245.3 7042.47,6373.1
  rectangle: 7082.77,6245.3 7151.72,6373.1
  rectangle: 7192.02,6245.3 7260.98,6373.1
  region: 6302.33,6145.1 6026.59,6145.1 6026.59,6106.8 6302.33,6106.8
  rectangle: 6342.45,6106.8 6618.19,6145.1
  region: 7673.54,6145.1 7397.8,6145.1 7397.8,6106.8 7673.54,6106.8
  region: 11807.09,307.09 11807.09,1011.81 11732.28,937.01 11732.28,381.89
  region: 11809.8,2831.25 11809.8,2126.52 11735,2201.33 11735,2756.45
  region: 11809.8,4335.2 11809.8,3630.47 11735,3705.28 11735,4260.39
  region: 2527.56,6496.06 1822.84,6496.06 1897.64,6421.26 2452.76,6421.26
  lines w4: 10660.17,113.53 ccw(c10675.14,113.53) 10675.14,98.55 10705.22,98.55 ccw(c10705.22,113.53) 10720.19,113.53 10720.19,170.64 ccw(c10705.22,170.64) 10705.22,185.61 10675.14,185.61 ccw(c10675.14,170.64) 10660.17,170.64 10660.17,113.53 ; 10760.17,113.53 ccw(c10775.14,113.53) 10775.14,98.55 10805.22,98.55 ccw(c10805.22,113.53) 10820.19,113.53 10820.19,170.64 ccw(c10805.22,170.64) 10805.22,185.61 10775.14,185.61 ccw(c10775.14,170.64) 10760.17,170.64 10760.17,113.53 ; 10860.17,113.53 ccw(c10875.14,113.53) 10875.14,98.55 10905.22,98.55 ccw(c10905.22,113.53) 10920.19,113.53 10920.19,170.64 ccw(c10905.22,170.64) 10905.22,185.61 10875.14,185.61 ccw(c10875.14,170.64) 10860.17,170.64 10860.17,113.53 ; 10960.17,113.53 ccw(c10975.14,113.53) 10975.14,98.55 11005.22,98.55 ccw(c11005.22,113.53) 11020.19,113.53 11020.19,170.64 ccw(c11005.22,170.64) 11005.22,185.61 10975.14,185.61 ccw(c10975.14,170.64) 10960.17,170.64 10960.17,113.53 ; 11060.17,113.53 ccw(c11075.14,113.53) 11075.14,98.55 11105.22,98.55 ccw(c11105.22,113.53) 11120.19,113.53 11120.19,170.64 ccw(c11105.22,170.64) 11105.22,185.61 11075.14,185.61 ccw(c11075.14,170.64) 11060.17,170.64 11060.17,113.53 ; 11160.17,113.53 ccw(c11175.14,113.53) 11175.14,98.55 11205.22,98.55 ccw(c11205.22,113.53) 11220.19,113.53 11220.19,170.64 ccw(c11205.22,170.64) 11205.22,185.61 11175.14,185.61 ccw(c11175.14,170.64) 11160.17,170.64 11160.17,113.53 ; 11260.17,113.53 ccw(c11275.14,113.53) 11275.14,98.55 11305.22,98.55 ccw(c11305.22,113.53) 11320.19,113.53 11320.19,170.64 ccw(c11305.22,170.64) 11305.22,185.61 11275.14,185.61 ccw(c11275.14,170.64) 11260.17,170.64 11260.17,113.53 ; 11360.17,113.53 ccw(c11375.14,113.53) 11375.14,98.55 11405.22,98.55 ccw(c11405.22,113.53) 11420.19,113.53 11420.19,170.64 ccw(c11405.22,170.64) 11405.22,185.61 11375.14,185.61 ccw(c11375.14,170.64) 11360.17,170.64 11360.17,113.53
  lines w8: 10667.69,103.04 10712.64,103.04 ; 10667.69,181.12 10712.64,181.12 ; 10767.69,103.04 10812.64,103.04 ; 10767.69,181.12 10812.64,181.12 ; 10867.69,103.04 10912.64,103.04 ; 10867.69,181.12 10912.64,181.12 ; 10967.69,103.04 11012.64,103.04 ; 10967.69,181.12 11012.64,181.12 ; 11067.69,103.04 11112.64,103.04 ; 11067.69,181.12 11112.64,181.12 ; 11167.69,103.04 11212.64,103.04 ; 11167.69,181.12 11212.64,181.12 ; 11267.69,103.04 11312.64,103.04 ; 11267.69,181.12 11312.64,181.12 ; 11367.69,103.04 11412.64,103.04 ; 11367.69,181.12 11412.64,181.12
Bottom Solder:
  drawing of 79 lines, arcs and shapes, not listed
1. Boundary:
  lines w3.94: 1477.7,6496.06 0,6496.06 ; 7558.86,6397.64 7618.11,6397.64 ccw(c7618.11,6417.32) 7637.8,6417.32 7637.8,6496.06 11811.03,6496.06 11811.02,5856.42 11501.2,5856.42 11501.2,5634.92 11811.02,5634.92 11811.02,0 2132.42,0 cw(c2132.42,78.74) 2053.68,78.74 2053.68,123.45 1132.13,123.45 1132.13,78.74 cw(c1053.39,78.74) 1053.39,0 0,0 0,6496.06 ; 7558.87,6397.64 7558.87,6338.58 cw(c7499.82,6338.58) 7440.76,6338.58 7440.76,6397.64 7431.12,6397.64 ccw(c7431.12,6377.95) 7411.43,6377.95 7411.43,6169.29 cw(c7391.75,6169.29) 7372.06,6169.29 7372.06,6377.95 ccw(c7352.38,6377.95) 7352.38,6397.64 6663.4,6397.64 ccw(c6663.4,6377.95) 6643.72,6377.95 6643.72,6169.29 cw(c6624.03,6169.29) 6604.35,6169.29 6604.35,6377.95 ccw(c6584.66,6377.95) 6584.66,6397.64 6575.02,6397.64 6575.02,6338.58 cw(c6515.96,6338.58) 6456.91,6338.58 6456.91,6397.64 6187.66,6397.64 6187.66,6338.58 cw(c6128.61,6338.58) 6069.55,6338.58 6069.55,6397.64 6059.91,6397.64 ccw(c6059.91,6377.95) 6040.22,6377.95 6040.22,6169.29 cw(c6020.54,6169.29) 6000.85,6169.29 6000.85,6377.95 ccw(c5981.16,6377.95) 5981.16,6397.64 5292.19,6397.64 ccw(c5292.19,6377.95) 5272.5,6377.95 5272.5,6169.29 cw(c5252.82,6169.29) 5233.13,6169.29 5233.13,6377.95 ccw(c5213.45,6377.95) 5213.45,6397.64 5203.8,6397.64 5203.8,6338.58 cw(c5144.75,6338.58) 5085.69,6338.58 5085.69,6397.64 5026.43,6397.64 cw(c5026.43,6417.32) 5006.74,6417.32 5006.74,6496.06 0,6496.06
2. Plated Through Routes:
  lines w0.39: 4977.22,6169.29 5528.4,6169.29 ; 4980.32,6169.29 5167.33,6169.29 ; 5252.81,5824.8 5252.81,6011.81 ; 5252.81,5893.7 5252.81,6444.88 ; 5252.81,6326.77 5252.81,6513.78 ; 5636.67,5390.68 5636.67,7244.31 ; 5744.93,6169.29 6296.11,6169.29 ; 6020.52,5824.8 6020.52,6011.81 ; 6020.52,5893.7 6020.52,6444.88 ; 6020.52,6326.77 6020.52,6513.78 ; 6250,6169.29 6437.01,6169.29 ; 6279.53,6169.29 6466.54,6169.29 ; 6348.43,6169.29 6899.61,6169.29 ; 6624.02,5824.8 6624.02,6011.81 ; 6624.02,5893.7 6624.02,6444.88 ; 6624.02,6326.77 6624.02,6513.78 ; 6781.5,6169.29 6968.51,6169.29 ; 7007.88,5391.66 7007.88,7245.29 ; 7047.25,6169.29 7234.26,6169.29 ; 7116.15,6169.29 7667.33,6169.29 ; 7391.74,5824.8 7391.74,6011.81 ; 7391.74,5893.7 7391.74,6444.88 ; 7391.74,6326.77 7391.74,6513.78 ; 7549.22,6169.29 7736.22,6169.29 ; 0,0 11811.03,0 11811.03,6496.06 7637.8,6496.06 7637.8,6417.32 cw(c7618.11,6417.32) 7618.11,6397.64 7558.86,6397.64 7558.86,6338.58 cw(c7499.81,6338.58) 7440.75,6338.58 7440.75,6397.64 7431.11,6397.64 ccw(c7431.11,6377.95) 7411.42,6377.95 7411.42,6169.29 cw(c7391.74,6169.29) 7372.05,6169.29 7372.05,6377.95 ccw(c7352.37,6377.95) 7352.37,6397.64 6663.39,6397.64 ccw(c6663.39,6377.95) 6643.7,6377.95 6643.7,6169.29 cw(c6624.02,6169.29) 6604.33,6169.29 6604.33,6377.95 ccw(c6584.65,6377.95) 6584.65,6397.64 6575,6397.64 6575,6338.58 cw(c6515.95,6338.58) 6456.89,6338.58 6456.89,6397.64 6187.65,6397.64 6187.65,6338.58 cw(c6128.59,6338.58) 6069.54,6338.58 6069.54,6397.64 6059.89,6397.64 ccw(c6059.89,6377.95) 6040.21,6377.95 6040.21,6169.29 cw(c6020.52,6169.29) 6000.84,6169.29 6000.84,6377.95 ccw(c5981.15,6377.95) 5981.15,6397.64 5292.18,6397.64 ccw(c5292.18,6377.95) 5272.49,6377.95 5272.49,6169.29 cw(c5252.81,6169.29) 5233.12,6169.29 5233.12,6377.95 ccw(c5213.44,6377.95) 5213.44,6397.64 5203.79,6397.64 5203.79,6338.58 cw(c5144.74,6338.58) 5085.68,6338.58 5085.68,6397.64 5026.43,6397.64 cw(c5026.43,6417.32) 5006.74,6417.32 5006.74,6496.06 0,6496.06 0,0 ; 5016.59,6161.42 5016.59,6279.53 5154.38,6279.53 5154.38,6161.42 5016.59,6161.42 ; 6118.95,6161.42 6256.74,6161.42 6256.74,6279.53 6118.95,6279.53 6118.95,6161.42 ; 6387.8,6161.42 6525.59,6161.42 6525.59,6279.53 6387.8,6279.53 6387.8,6161.42 ; 7490.16,6161.42 7627.96,6161.42 7627.96,6279.53 7490.16,6279.53 7490.16,6161.42
5. Daughter:
  circle w5: c11700.79,3070.86 r25.59
  circle w5: c10393.7,4881.89 r49.21
  circle w5: c10393.7,1259.84 r49.21
  circle w5: c8736.22,3161.42 r68.9
  circle w5: c11614.17,196.85 r68.9
  circle w5: c11614.17,6299.21 r68.9
  circle w5: c9086.61,3070.86 r25.59
  lines w5: 9064.96,1903.26 9036.29,1903.26 9036.29,1209.77 ccw(c9055.95,1209.76) 9054.27,1190.18 ccw(c10393.7,16781.5) 11733.13,1190.18 ccw(c11731.45,1209.76) 11751.11,1209.77 11751.11,4931.96 ccw(c11731.45,4931.97) 11733.13,4951.55 ccw(c10393.7,-10639.77) 9054.27,4951.55 ccw(c9055.95,4931.97) 9036.29,4931.96 9036.29,2978.63 9064.96,2978.63 ; 9127.95,1921.26 9102.8,1921.26 ; 9127.95,2944.88 9102.8,2944.88 ; 11023.64,0 11811.02,0 11811.02,6496.06 11023.64,6496.06 ; 8742.51,1921.26 8704.6,1921.26 8704.6,2944.88 8742.51,2944.88 ; 8742.51,1921.26 8816.07,1921.26 ; 8742.51,1921.26 8742.51,2944.88 ; 8742.51,2944.88 8816.07,2944.88 ; 8816.07,1921.26 9102.8,1921.26 ; 8816.07,1921.26 8816.07,2944.88 ; 8816.07,2944.88 9102.8,2944.88 ; 9064.96,2978.63 9064.96,2979.31 9064.96,4923.7 cw(c10393.7,-10639.77) 11722.44,4923.7 11722.44,1218.03 cw(c10393.7,16781.5) 9064.96,1218.03 9064.96,1902.57 9108.34,1902.57 9108.34,1266.97 ccw(c9118.17,1266.97) 9117.36,1257.17 ccw(c10393.7,16781.5) 10299.49,1205.08 ccw(c10299.55,1214.91) 10308.42,1219.16 cw(c10393.7,1259.84) 10478.98,1219.16 ccw(c10487.85,1214.91) 10487.91,1205.08 ccw(c10393.7,16781.5) 11670.04,1257.17 ccw(c11669.23,1266.97) 11679.06,1266.97 11679.06,4874.76 11670.04,4884.56 ccw(c10393.7,-10639.77) 10487.91,4936.65 ccw(c10487.85,4926.82) 10478.98,4922.57 cw(c10393.7,4881.89) 10308.42,4922.57 ccw(c10299.55,4926.82) 10299.49,4936.65 ccw(c10393.7,-10639.77) 9117.36,4884.56 ccw(c9118.17,4874.76) 9108.34,4874.76 9108.34,2979.31 9064.96,2978.63 ; 9102.8,1921.26 9102.8,2944.88 ; 9127.95,1370.08 9127.95,4767.72 11659.45,4767.72 11659.45,1370.08 9127.95,1370.08 ; 9147.64,1381.89 9147.64,4755.91 11639.76,4755.91 11639.76,1381.89 9147.64,1381.89 ; 9259.05,1694.49 11528.35,1694.49 11528.35,4667.72 9259.05,4667.72 9259.05,1694.49 ; 9288.58,1718.11 11498.82,1718.11 11498.82,4632.28 9288.58,4632.28 9288.58,1718.11